# Altium PCB Dimmer_Board.PcbDoc
Units mm, origin at the board's own origin, x right, y up, seen from the top; angles counter-clockwise.
Board outline 61 x 37 mm, 2 copper layers (Top Layer, Bottom Layer), stack 1.57 mm thick; 11 components, 10 nets, 30 pads, 74 vias.
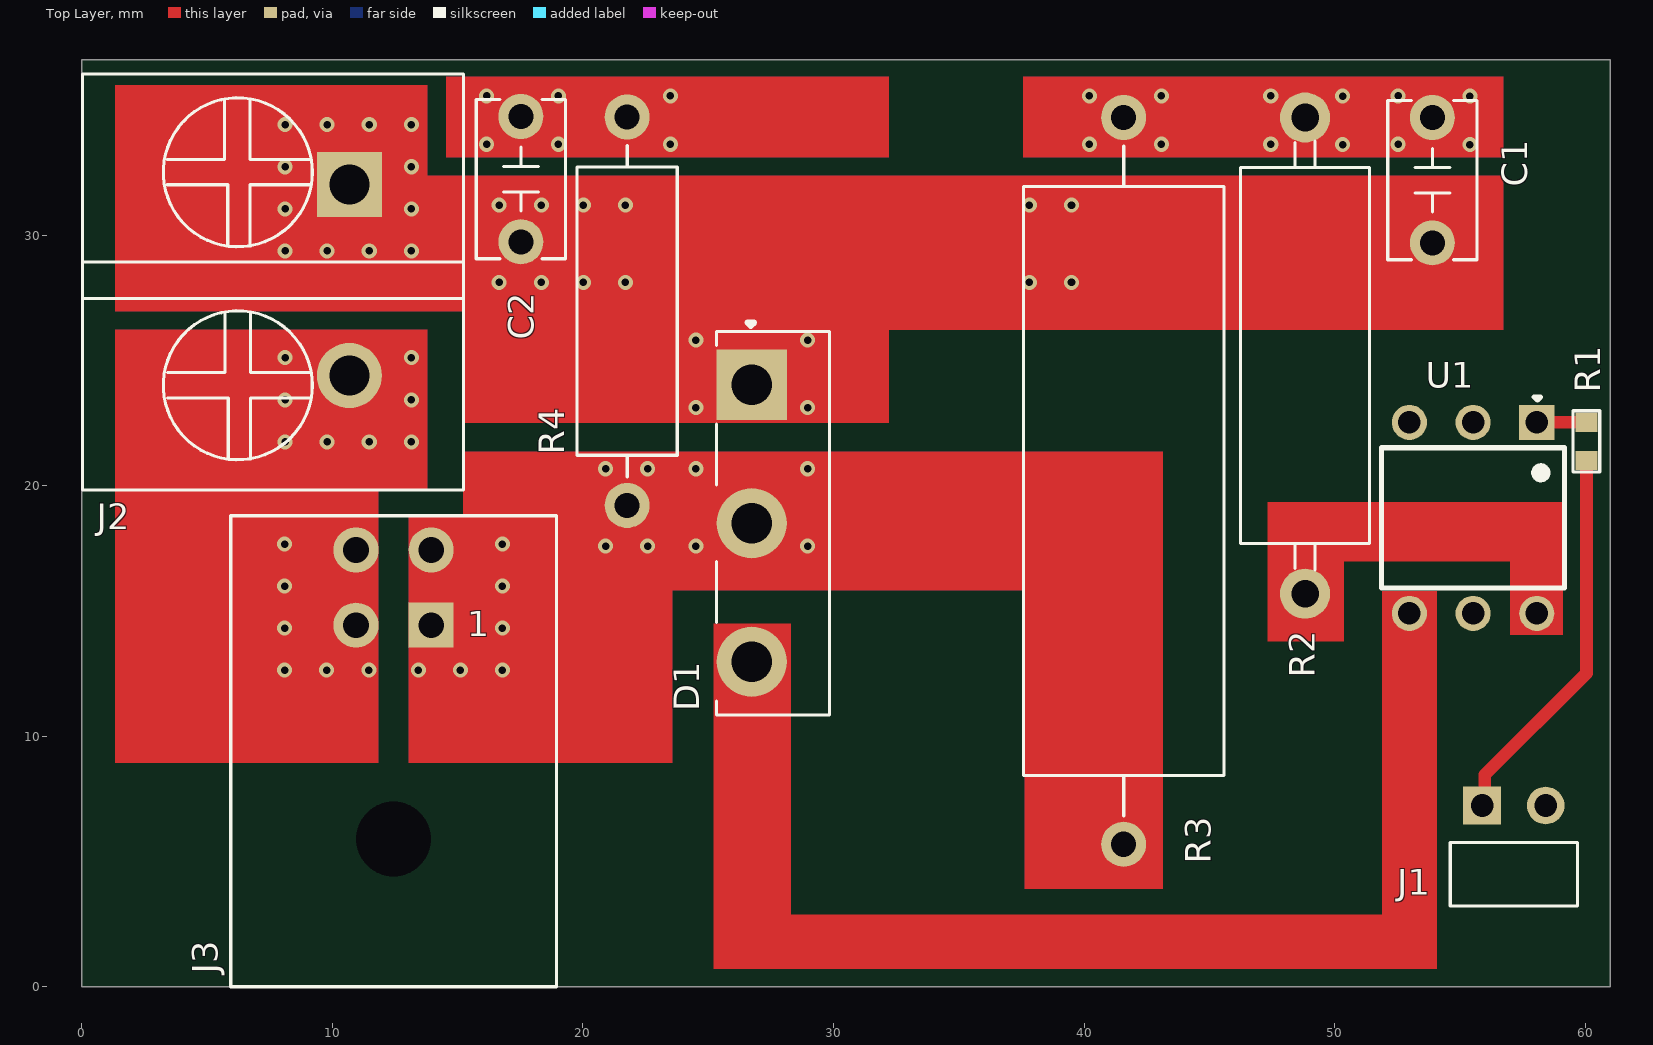
[diagram p0: Top Layer view]
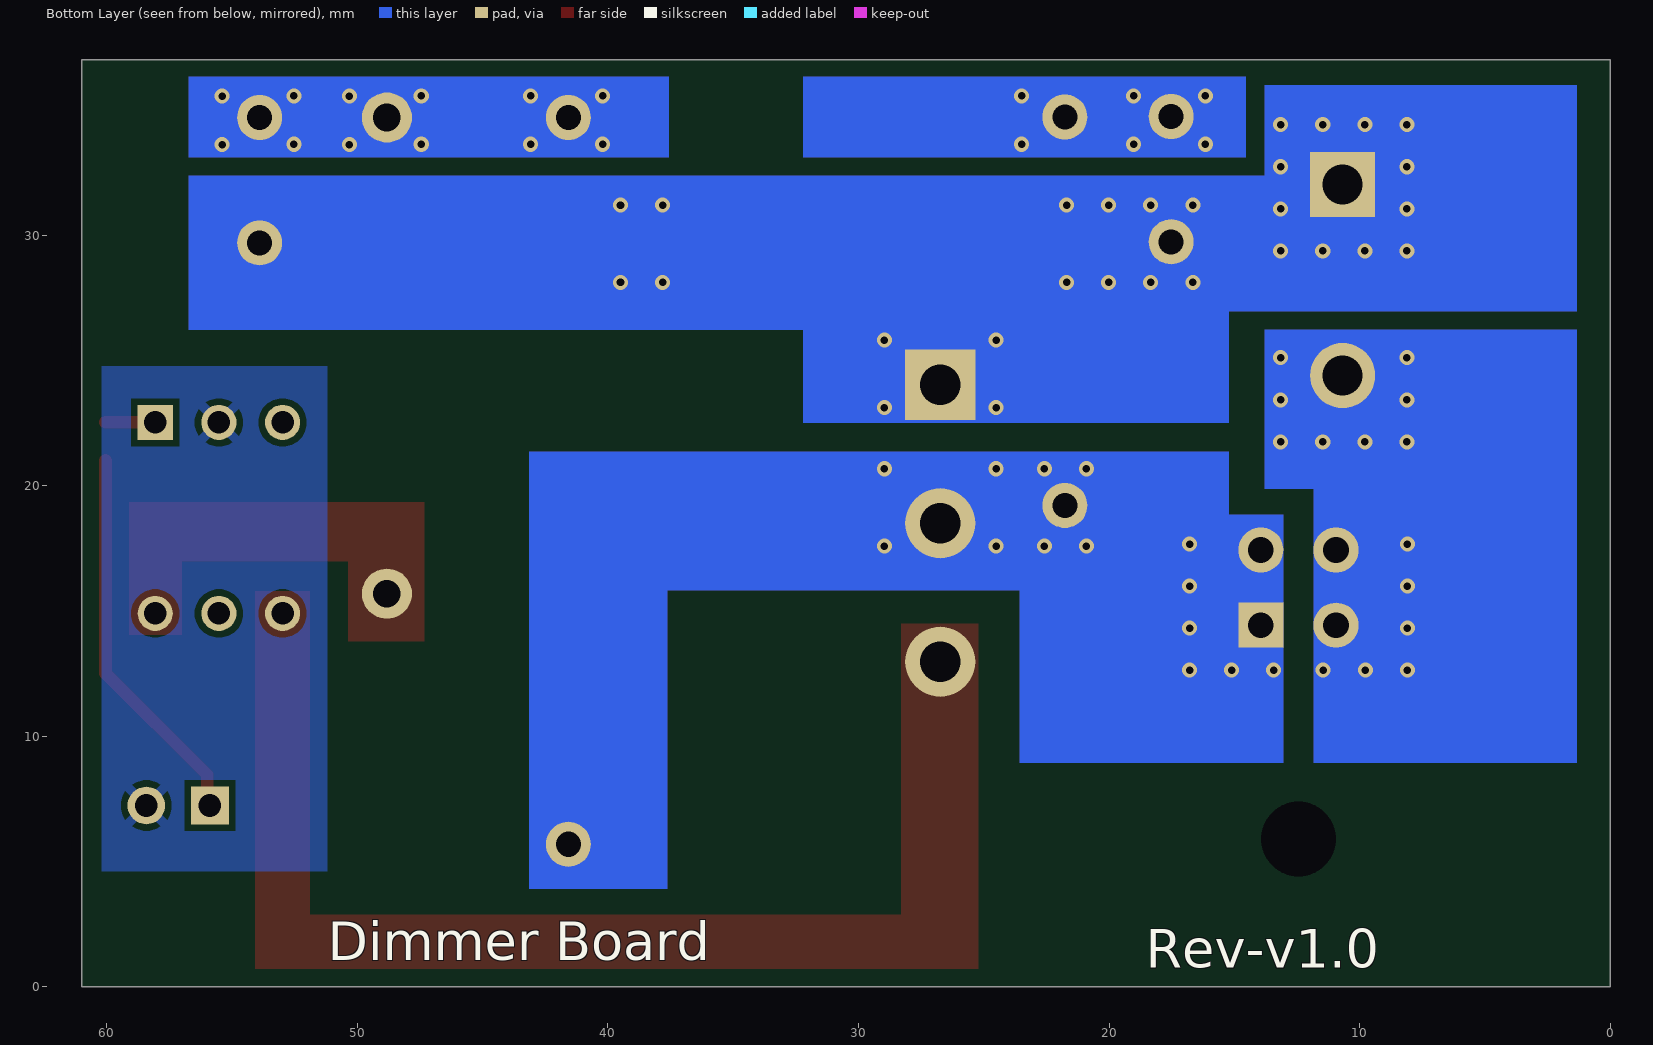
[diagram p1: Bottom Layer view, seen from below]
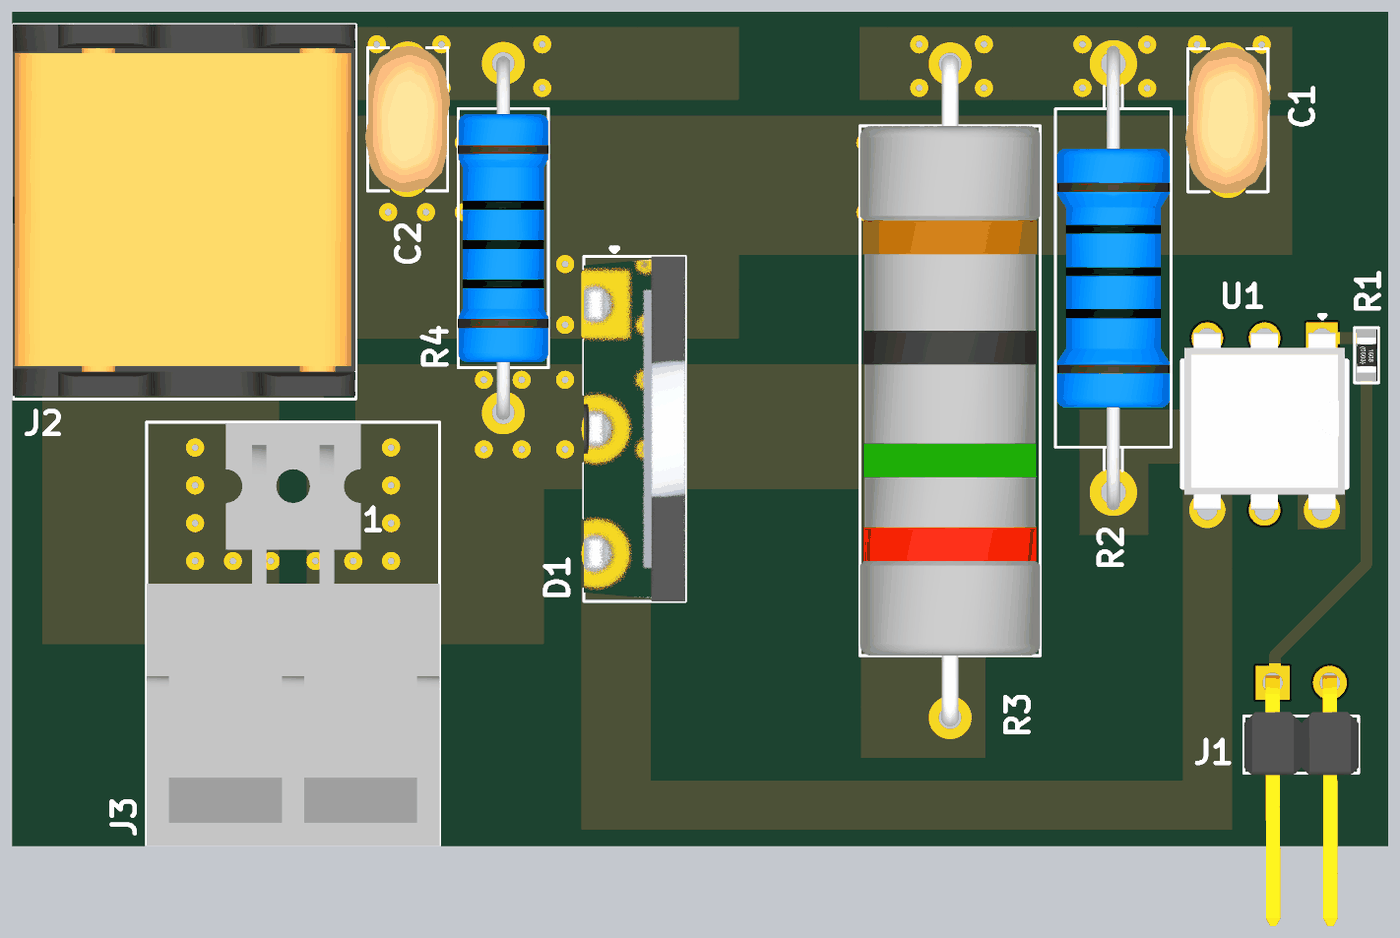
[diagram p2: 3D render of the assembled board from above, using the file's embedded part models]

## Layer stack, top to bottom
Top Solder: solder mask 0.01, Solder Resist, Dk 3.5
Top Layer: signal copper 0.035
Dielectric 1: dielectric 1.5, FR-4, Dk 4.8
Bottom Layer: signal copper 0.035
Bottom Solder: solder mask 0.01, Solder Resist, Dk 3.5

## Board outline
0,0 61,0 61,37 0,37

## Design rules (kind name [scope] priority, off if disabled: settings)
Clearance [All] p1: gap=0.254 ignorepadtopadclearanceinfootprint=FALSE
ComponentClearance [All] p1: gap=0 collisioncheckmode=3 verticalgap=0 showdistances=FALSE
HoleSize [All] p1: absolutevalues=TRUE maxlimit=3 minlimit=0.025 maxpercent=80.000 minpercent=20.000
MinimumSolderMaskSliver [All] p1: minsoldermaskwidth=0
PolygonConnect [All] p1: thpad.connectstyle=Relief thpad.reliefconductorwidth=0.381 thpad.reliefentries=4 thpad.polygonreliefangle="45 Angle" thpad.airgapwidth=0.254 smdpad.connectstyle=Direct smdpad.reliefconductorwidth=0.254 smdpad.reliefentries=4 smdpad.polygonreliefangle="90 Angle" smdpad.airgapwidth=0.254 via.connectstyle=Direct via.reliefconductorwidth=0.254 via.reliefentries=4 via.polygonreliefangle="90 Angle" via.airgapwidth=0.254
RoutingVias [All] p1: holewidth=0.3 width=0.6 viastyle="Through Hole" minholewidth=0.3 minwidth=0.6 maxholewidth=0.3 maxwidth=0.6
SilkToSilkClearance [All] p1: silktosilkclearance=0.127
SilkToSolderMaskClearance [IsPad] p1: minsilkscreentomaskgap=0 clearancetoexposedcopper=TRUE
SolderMaskExpansion [All] p1: expansion=0.102 istentingtop=FALSE
SupplyNets "Schematic Supply Nets_3" [InNet('NEUTRAL')] p1: voltage=0.000
SupplyNets "Schematic Supply Nets_2" [InNet('GND')] p2: voltage=0.000
SupplyNets "Schematic Supply Nets_1" [InNet('LOAD')] p3: voltage=0.000
SupplyNets "Schematic Supply Nets" [InNet('LIVE')] p4: voltage=0.000
UnRoutedNet [All] p1: checkbadconnections=TRUE
Width [All] p1: maxlimit=0.762 minlimit=0.254 preferedwidth=0.254 minimp=50.000000 maximp=50.000000 favimp=50.000000
24 further rules are at their usual default settings.

## Components (designator, comment, footprint, x,y, rotation, side; value= is the part's Value field where it differs from the comment)
C1 "10nF" KP103J2G0501 53.899,32.191 r270 top
C2 "10nF" KP103J2G0501 17.526,32.233 r90 top
D1 "BTA41-600BRG" TOP3 26.738,18.5 r270 top
J1 "PZ254R-11-02P" "HDR1X2 (R/A Male)" 55.88,7.239 r0 top
J2 "DBT50G-7.62-2P-BK-P" DBT50G-7.62-2P-BK-P 10.681,28.205 r270 top
J3 "0444280401" 0444280401- 12.446,14.434 r0 top
R1 "270R" Res-0603 60.046,21.768 r90 top
R2 "1K" MFR3WSJT-73-1K 48.819,25.191 r90 top value=1kR
R3 "560R" EWWR0006J500RT9 41.58,20.191 r270 top
R4 "39R" MFR2WSJT-73-39R 21.768,26.961 r270 top
U1 "MOC3023M" "6 Pin Dip" 55.524,18.714 r270 top

## Footprints (in the part's own frame and the unit in brackets; to place one, negate y for a bottom-side part, rotate by r counter-clockwise, add the part's x,y. Pads: shape width x height; smd on the part's side, far side on the other; paste and mask are expansions set on the pad)
"6 Pin Dip" [mm]
  rect 1.4x1.4 hole 0.9: 1(-3.81,2.54)
  round 1.4 hole 0.9: 2(-3.81,0) 3(-3.81,-2.54) 4(3.81,-2.54) 5(3.81,0) 6(3.81,2.54)
  silkscreen extent -4.83,-3.65 2.8,3.65, body extent -4.06,-3.56 3.81,3.56, height 4.8
0444280401- [mm]
  rect 1.8x1.8 hole 1.02: 1(1.5,0)
  round 1.8 hole 1.02: 2(-1.5,0) 3(1.5,3) 4(-1.5,3)
  round 0 hole 3 unplated: MP1(0,-8.53)
  silkscreen extent -6.5,-14.43 6.5,4.37, body extent -6.5,-14.4 6.5,4.31, height 11.95
DBT50G-7.62-2P-BK-P [mm]
  rect 2.6x2.6 hole 1.6: 1(-3.81,0)
  round 2.6 hole 1.6: 2(3.81,0)
  silkscreen extent -8.22,-10.65 8.38,4.55, body extent -8.25,-10.67 8.25,4.53, height 16.3
EWWR0006J500RT9 [mm]
  round 1.8 hole 1 paste-2539.97 mask+0.051: 1(-14.5,0) 2(14.5,0)
  silkscreen extent -13.37,-4 13.37,4, body extent -14.87,-3.99 14.87,3.99, height 8
"HDR1X2 (R/A Male)" [mm] "CONN HEADER VERT 2POS 2.54MM"
  rect 1.5x1.5 hole 0.9: 1(0,0)
  round 1.5 hole 0.9: 2(2.54,0)
  silkscreen extent -1.27,-4.01 3.81,-1.47, body extent -1.27,-10.8 3.82,0.32, height 3.09
KP103J2G0501 [mm]
  round 1.8 hole 1 paste-2539.97 mask+0.05: 1(-2.5,0) 2(2.5,0)
  silkscreen extent -3.18,-1.78 3.17,1.78, body extent -3.25,-1.88 3.25,1.88, height 9.75
MFR2WSJT-73-39R [mm]
  round 1.8 hole 1 paste-2539.97 mask+0.051: 1(-7.75,0) 2(7.75,0)
  silkscreen extent -6.61,-2 6.6,2, body extent -8.05,-2 8.05,2, height 4.01
MFR3WSJT-73-1K [mm]
  round 2 hole 1.1 paste-2539.97 mask+0.051: 1(-9.5,0) 2(9.5,0)
  silkscreen extent -8.55,-2.57 8.55,2.57, body extent -10.3,-2.51 10.3,2.51, height 5.01
Res-0603 [mil]
  rect 30x35 smd: 1(-30,0) 2(30,0)
  silkscreen extent -48,-21 48,21, body extent -31,-17 31,17, height 18
TOP3 [mm]
  rect 2.8x2.8 hole 1.63: 1(-5.525,0)
  round 2.8 hole 1.63: 2(0,0) 3(5.525,0)
  silkscreen extent -8.01,-1.4 7.65,3.1, body extent -7.65,-1.4 7.65,3.1, height 21.1

## Part data
C1 C2: library part KP103J2G0501, "10nF -40℃~+100℃ ±5% 400V Plugin,P=5mm Polypropylene Film Capacitors (CBB) ROHS", LCSC Part Number=C3019055, Manufacturer=KYET, Package=Plugin,P=5mm, ComponentLink1Description=LCSC, ComponentLink1URL=https://www.lcsc.com/product-detail/Polypropylene-Film-Capacitors-CBB_KYET-KP103J2G0501_C3019055.html, Item Type=Capacitor, Manufacturer Part Number=KP103J2G0501
D1: "80mA 50mA 600V TOP-3 Thyristors (SCR)/Modules ROHS", LCSC Part Number=C9103, Manufacturer=STMicroelectronics, Package=TOP-3, ComponentLink1Description="LCSC Link", ComponentLink1URL=https://www.lcsc.com/product-detail/Thyristors-SCR-Modules_STMicroelectronics-BTA41-600BRG_C9103.html, Item Type=Thyristors, Manufacturer Part Number=BTA41-600BRG
J1: "Right-Angle Square Pins 2.5mm 2P 6mm -40℃~+105℃ 2.54mm Plugin Black Brass 1x2P Push-Pull,P=2.54mm Pin Headers ROHS", LCSC Part Number=C492410, Manufacturer=XFCN, Package=Push-Pull,P=2.54mm, ComponentLink1Description=LCSC, ComponentLink1URL=https://www.lcsc.com/product-detail/Pin-Headers_XFCN-PZ254R-11-02P_C492410.html, Item Type="R/A Male Header", Manufacturer Part Number=PZ254R-11-02P
J2: "1x2P Corner With Cover Plate 2 1 7.62mm -40℃~+105℃ 20A 300V Black 12~22 Straight Needle Plugin,P=7.62mm Barrier Terminal Blocks ROHS", LCSC Part Number=C496127, Manufacturer=DORABO, Package=Plugin,P=7.62mm, ComponentLink1Description=LCSC, ComponentLink1URL=https://www.lcsc.com/product-detail/Barrier-Terminal-Blocks_DORABO-DBT50G-7-62-2P-BK-P_C496127.html, Item Type="Terminal Block", Manufacturer Part Number=DBT50G-7.62-2P-BK-P
J3: "CONN HEADER R/A 4POS 3MM", LCSC Part Number=C17645517, Manufacturer=Molex, Supplier Part Number=23-0444280401-ND, ComponentLink1Description=https://datasheet.ciiva.com/3119/0444280401-pcb-headers-3119509.pdf?src-supplier=Avnet, ComponentLink1URL=https://datasheet.ciiva.com/3119/0444280401-pcb-headers-3119509.pdf?src-supplier=Avnet, ComponentLink2Description=LCSC, ComponentLink2URL=https://www.lcsc.com/product-detail/Wire-To-Board-Connector_MOLEX-0444280401_C17645517.html, Item Type=Connector, Manufacturer Part Number=0444280401, Pricing="1=1.73, 10=1.47, 80=1.21413, 945=1.12499 (USD)", RoHS=Yes, Stock=7960, Supplier=Digikey
R1: library part RT0603BRE07270RL, "RES SMD 270 OHM 0.1% 1/10W 0603", Case/Package=0603, LCSC Part Number=C705836, Manufacturer=Yageo, Max Operating Temperature=125°C, Max Power Dissipation=100mW, Min Operating Temperature=-55°C, Package Quantity=5000, Resistor Type="Thin Film", Supplier Part Number 1=RT0603BRE07270RL-ND, Temperature Coefficient=50ppm/°C, Tolerance=0.1%, Voltage Rating (DC)=50V, Category="Chip SMD Resistors", ComponentLink1Description=https://datasheet.ciiva.com/2584/pyu-rt-1-to-0-05-rohs-l-5-2584379.pdf?src-supplier=Digi-Key, ComponentLink1URL=https://datasheet.ciiva.com/2584/pyu-rt-1-to-0-05-rohs-l-5-2584379.pdf?src-supplier=Digi-Key, Construction=Rectangular, Depth=0.8mm, Height=0.022inch, Item Type=Resistor, Lead Free="Lead Free", Length=0.063inch, Manufacturer Part Number=RT0603BRE07270RL, Military Standard=Not, Number of Terminations=2, Packaging="Tape and Reel", Pricing 1="5000=0.04770 (USD)", Resistance=270R, RoHS=Yes, RoHS Compliant=Yes, Series=RT, Supplier 1=Digi-Key, Width=0.031inch
R2: library part MFR3WSJT-73-1K, "RES 1K OHM 5% 3W AXIAL", Case/Package=Axial, LCSC Part Number=C176599, Manufacturer=Yageo, Max Operating Temperature=155°C, Max Power Dissipation=3W, Min Operating Temperature=-55°C, Tolerance=5%, ComponentLink1Description=http://www.yageo.com/NewPortal/yageodocoutput?fileName=/pdf/throughhole/Yageo_LR_MFR_2013.pdf&src-supplier=Digikey, ComponentLink1URL=http://www.yageo.com/NewPortal/yageodocoutput?fileName=/pdf/throughhole/Yageo_LR_MFR_2013.pdf&src-supplier=Digikey, Item Type=Resistor, Manufacturer Part Number=MFR3WSJT-73-1K, Number of Terminations=2, Packaging="Tape and Reel", Pricing="5000=0.04394 (USD)", RoHS=Yes, RoHS Compliant=Yes, Series=MFR, Supplier=Digikey
R3: library part EWWR0006J560RT9, "Wirewound Resistors 560Ω 6W ±250ppm/℃ ±5% Plugin,D8xL23.5mm Through Hole Resistors ROHS", LCSC Part Number=C348992, Manufacturer=RESI, Package=Plugin,D8xL23.5mm, ComponentLink1Description=LCSC, ComponentLink1URL=https://www.lcsc.com/product-detail/Through-Hole-Resistors_RESI-EWWR0006J560RT9_C348992.html, Item Type=Resistor, Manufacturer Part Number=EWWR0006J560RT9
R4: library part MFR2WSJT-73-39R, "Metal Film Resistors 39Ω 2W ±5% Plugin,D4.5xL11.5mm Through Hole Resistors ROHS", LCSC Part Number=C176578, Manufacturer=YAGEO, Package=Plugin,D4.5xL11.5mm, ComponentLink1Description=LCSC, ComponentLink1URL=https://www.lcsc.com/product-detail/Through-Hole-Resistors_YAGEO-MFR2WSJT-73-39R_C176578.html, Item Type=Resistor, Manufacturer Part Number=MFR2WSJT-73-39R
U1: "OPTOISOLATOR 4.17KV TRIAC 6DIP", LCSC Part Number=C5240, Manufacturer="ON Semiconductor / Fairchild", ComponentLink1Description=https://datasheet.ciiva.com/15118/getdatasheetpartid-110426-15118245.pdf?src-supplier=Verical, ComponentLink1URL=https://datasheet.ciiva.com/15118/getdatasheetpartid-110426-15118245.pdf?src-supplier=Verical, ComponentLink2Description=https://datasheet.ciiva.com/8074/1806097-8074079.pdf?src-supplier=Element14, ComponentLink2URL=https://datasheet.ciiva.com/8074/1806097-8074079.pdf?src-supplier=Element14, ComponentLink3Description=https://datasheet.ciiva.com/8084/moc3023m-8084955.pdf?src-supplier=Avnet, ComponentLink3URL=https://datasheet.ciiva.com/8084/moc3023m-8084955.pdf?src-supplier=Avnet, ComponentLink4Description=https://datasheet.ciiva.com/2092/moc3010m-2092979.pdf?src-supplier=Digikey, ComponentLink4URL=https://datasheet.ciiva.com/2092/moc3010m-2092979.pdf?src-supplier=Digikey, Item Type=IC, Manufacturer Part Number=MOC3023M, Pricing="1=0.215, 200=0.205, 750=0.196, 2500=0.19, 10000=0.176 (USD)", RoHS=Yes, Stock=46500, Supplier="Future Electronics"

## Via types
v1: diameter 0.6, hole 0.3, Top Layer to Bottom Layer, 74 vias

## Nets (pads, with @x,y where several pads share a name; then routed paths per layer and width w, separated by ;. In a path a pad name is that pad's centre, name@x,y a point inside that pad or via, vN(x,y) a via of type N, cw(c..) or ccw(c..) an arc to the next point about the centre after c; other vN are vias at no path point)
GND: J1.2 U1.2
LIVE: D1.2 J3.1 J3.3 R3.2 R4.2
  other v1: 13.435,12.639 15.113,12.639 16.791,12.639 16.791,14.317 16.791,15.995 20.904,17.591 22.582,17.591 24.509,17.591 28.967,17.591 16.791,17.673 20.904,20.676 22.582,20.676 24.509,20.676 28.967,20.676
LOAD: C1.2 C2.1 D1.1 J2.1
  other v1: 24.509,23.116 28.967,23.116 24.509,25.81 28.967,25.81 16.662,28.113 18.34,28.113 20.018,28.113 21.696,28.113 37.821,28.113 39.498,28.113 8.12,29.371 9.798,29.371 11.476,29.371 13.154,29.371 8.12,31.048 13.154,31.048 16.662,31.197 18.34,31.197 20.018,31.197 21.696,31.197 37.821,31.197 39.498,31.197 8.12,32.726 13.154,32.726 8.12,34.404 9.798,34.404 11.476,34.404 13.154,34.404
NetC1_1: C1.1 R2.2 R3.1
  other v1: 40.21,33.624 43.081,33.624 47.449,33.624 50.32,33.614 52.529,33.624 55.4,33.613 40.21,35.556 43.081,35.556 47.449,35.556 50.32,35.545 52.529,35.556 55.4,35.545
NetC2_2: C2.2 R4.1
  other v1: 16.157,33.624 19.027,33.624 23.493,33.624 16.157,35.556 19.027,35.556 23.493,35.556
NetD1_3: D1.3 U1.4
NetR1_2: R1.2 U1.1 | length 2
  Top Layer w0.508: U1.1 58.067,22.527 60.043,22.527 R1.2
NetR2_1: R2.1 U1.6
NEUTRAL: J2.2 J3.2 J3.4
  other v1: 8.101,12.639 9.779,12.639 11.457,12.639 8.101,14.317 8.101,15.995 8.101,17.673 8.12,21.751 9.798,21.751 11.476,21.751 13.154,21.751 8.12,23.428 13.154,23.428 8.12,25.106 13.154,25.106
TRIG: J1.1 R1.1 | length 15.5
  Top Layer w0.508: J1.1 55.985,7.344 55.985,8.453 60.046,12.514 R1.1
pads on no net: J3.MP1 U1.3 U1.5

## Polygon pours and split planes (outlines as drawn)
GND on Bottom Layer "GND_L02_P000" (solid, pour order 0): 51.206,24.765 51.206,4.623 60.198,4.623 60.198,24.765

## Other copper
Top Layer:
  rectangle net NetC1_1: 37.567,33.096 56.744,36.322
  rectangle net LOAD: 25.451,26.213 56.744,32.385
  region net NetR2_1: 50.368,19.355 47.32,19.355 47.32,13.79 50.368,13.79
  rectangle net NetR2_1: 47.32,16.967 59.106,19.355
  rectangle net NetR2_1: 56.998,14.046 59.106,19.355
  rectangle net NetD1_3: 51.893,0.711 54.077,15.799
  rectangle net NetD1_3: 25.222,0.711 54.077,2.896
  rectangle net NetD1_3: 25.222,0.711 28.296,14.503
  rectangle net LIVE: 13.046,8.941 23.571,18.847
  rectangle net LIVE: 15.215,15.824 43.155,21.361
  rectangle net LIVE: 37.617,3.912 43.155,21.361
  region net NEUTRAL: 11.835,26.238 1.321,26.238 1.321,8.941 11.835,8.941
  rectangle net NEUTRAL: 1.321,19.863 13.792,26.238
  rectangle net LOAD: 1.321,26.949 13.792,35.992
  rectangle net LOAD: 1.321,26.949 32.207,32.385
  rectangle net LOAD: 15.215,22.504 32.207,32.385
  rectangle net NetC2_2: 14.529,33.096 32.207,36.322
Bottom Layer:
  rectangle net NetC1_1: 37.567,33.096 56.744,36.322
  rectangle net LOAD: 25.451,26.213 56.744,32.385
  rectangle net LIVE: 15.215,15.824 43.155,21.361
  rectangle net LIVE: 13.046,8.941 23.571,18.847
  rectangle net LIVE: 37.617,3.912 43.155,21.361
  rectangle net NEUTRAL: 1.321,19.863 13.792,26.238
  region net NEUTRAL: 11.835,26.238 1.321,26.238 1.321,8.941 11.835,8.941
  rectangle net LOAD: 1.321,26.949 13.792,35.992
  rectangle net LOAD: 1.321,26.949 32.207,32.385
  rectangle net LOAD: 15.215,22.504 32.207,32.385
  rectangle net NetC2_2: 14.529,33.096 32.207,36.322

## Silkscreen, mask and mechanical layers (free items; w line width, h text height)
Bottom Overlay:
  text "Dimmer Board" at 51.177,1.061 h1.52
  text "Rev-v1.0" at 18.542,0.762 h1.52
Board Outline:
  the board outline again, w0.254
Fabrication:
  drawing of 191 lines, arcs and shapes, not listed
  text "Layer" at 83.528,46.101 h1.52
  text "Name" at 93.94,46.101 h1.52
  text "Material" at 117.555,46.101 h1.52
  text "Thickness" at 139.393,46.101 h1.52
  text "Constant" at 155.899,46.101 h1.52
  text "Board Layer Stack" at 170.374,46.101 h1.52
  text "Top Overlay" at 93.94,43.053 h1.52
  text "Top Solder" at 93.94,40.005 h1.52
  text "Solder Resist" at 117.555,40.005 h1.52
  text "0.39mil" at 139.393,40.005 h1.52
  text "3.5" at 155.899,40.005 h1.52
  text "1" at 83.528,36.957 h1.52
  text "Top Layer" at 93.94,36.957 h1.52
  text "1.38mil" at 139.393,36.957 h1.52
  text "Dielectric 1" at 93.94,33.909 h1.52
  text "FR-4" at 117.555,33.909 h1.52
  text "59.06mil" at 139.393,33.909 h1.52
  text "4.8" at 155.899,33.909 h1.52
  text "2" at 83.528,30.861 h1.52
  text "Bottom Layer" at 93.94,30.861 h1.52
  text "1.38mil" at 139.393,30.861 h1.52
  text "Bottom Solder" at 93.94,27.813 h1.52
  text "Solder Resist" at 117.555,27.813 h1.52
  text "0.39mil" at 139.393,27.813 h1.52
  text "3.5" at 155.899,27.813 h1.52
  text "Bottom Overlay" at 93.94,24.765 h1.52
  text "Total board thickness:" at 83.528,21.717 h1.52
  text "62.60mil" at 139.393,21.717 h1.52
Drill Drawing:
  circle w0.254: c2.759,74.164 r0.847
  lines w0.254: 1.912,58.077 1.912,58.5 2.336,58.924 1.912,59.347 1.912,59.77 2.336,59.77 2.759,59.347 3.182,59.77 3.606,59.77 3.606,59.347 3.182,58.924 3.606,58.5 3.606,58.077 3.182,58.077 2.759,58.5 2.336,58.077 1.912,58.077 ; 1.912,61.887 3.606,61.887 3.606,63.58 1.912,63.58 1.912,61.887 ; 1.912,66.12 2.336,66.12 2.759,65.697 3.182,66.12 3.606,66.12 3.182,66.544 3.606,66.967 3.182,66.967 2.759,67.39 2.336,66.967 1.912,66.967 2.336,66.544 1.912,66.12 ; 1.912,69.507 2.759,69.93 3.606,69.507 3.182,70.354 3.606,71.2 2.759,70.777 1.912,71.2 2.336,70.354 1.912,69.507 ; 1.912,78.82 3.606,78.82 2.759,77.127 1.912,78.82 ; 1.912,80.937 3.606,80.937 3.606,82.63 1.912,82.63 1.912,80.937 ; 1.912,85.17 2.336,85.17 2.336,84.747 3.182,84.747 3.182,85.17 3.606,85.17 3.606,86.017 3.182,86.017 3.182,86.44 2.336,86.44 2.336,86.017 1.912,86.017 1.912,85.17 ; 2.251,81.276 3.267,81.276 3.267,82.292 2.251,82.292 2.251,81.276
  lines w0.381: 0.394,56.934 282.61,56.934 ; 0.394,87.414 282.61,87.414 ; 14.386,53.124 14.386,91.224 ; 29.368,53.124 29.368,91.224 ; 57.808,53.124 57.808,91.224 ; 70.657,53.124 70.657,91.224 ; 89.296,53.124 89.296,91.224 ; 127.384,53.124 127.384,91.224 ; 142.366,53.124 142.366,91.224 ; 161.31,53.124 161.31,91.224 ; 192.034,53.124 192.034,91.224 ; 213.72,53.124 213.72,91.224 ; 247.594,53.124 247.594,91.224 ; 0.394,53.124 282.61,53.124 282.61,91.224 0.394,91.224 0.394,53.124
  text "Symbol" at 2.68,88.557 h1.83
  text "Count" at 15.529,88.557 h1.83
  text "Hole Size" at 30.511,88.557 h1.83
  text "Plated" at 58.951,88.557 h1.83
  text "Hole Type" at 71.8,88.557 h1.83
  text "Drill Layer Pair" at 90.439,88.557 h1.83
  text "Via/Pad" at 128.527,88.557 h1.83
  text "Pad Shape" at 143.509,88.557 h1.83
  text "Template" at 162.453,88.557 h1.83
  text "Description" at 193.177,88.557 h1.83
  text "Hole Tolerance (+)" at 214.863,88.557 h1.83
  text "Hole Tolerance (-)" at 248.737,88.557 h1.83
  text "1" at 15.529,84.747 h1.52
  text "3.000mm (118.11mil)" at 30.511,84.747 h1.52
  text "NPTH" at 58.951,84.747 h1.52
  text "Round" at 71.8,84.747 h1.52
  text "Top Layer - Bottom Layer" at 90.439,84.747 h1.52
  text "Pad" at 128.527,84.747 h1.52
  text "Rounded" at 143.509,84.747 h1.52
  text "c0hn300" at 162.453,84.747 h1.52
  text "2" at 15.529,80.937 h1.52
  text "1.100mm (43.31mil)" at 30.511,80.937 h1.52
  text "PTH" at 58.951,80.937 h1.52
  text "Round" at 71.8,80.937 h1.52
  text "Top Layer - Bottom Layer" at 90.439,80.937 h1.52
  text "Pad" at 128.527,80.937 h1.52
  text "Rounded" at 143.509,80.937 h1.52
  text "c200h110m205mx205p0" at 162.453,80.937 h1.52
  text "2" at 15.529,77.127 h1.52
  text "1.600mm (62.99mil)" at 30.511,77.127 h1.52
  text "PTH" at 58.951,77.127 h1.52
  text "Round" at 71.8,77.127 h1.52
  text "Top Layer - Bottom Layer" at 90.439,77.127 h1.52
  text "Pad" at 128.527,77.127 h1.52
  text "(Mixed)" at 143.509,77.127 h1.52
  text "(Mixed)" at 162.453,77.127 h1.52
  text "3" at 15.529,73.317 h1.52
  text "1.630mm (64.17mil)" at 30.511,73.317 h1.52
  text "PTH" at 58.951,73.317 h1.52
  text "Round" at 71.8,73.317 h1.52
  text "Top Layer - Bottom Layer" at 90.439,73.317 h1.52
  text "Pad" at 128.527,73.317 h1.52
  text "(Mixed)" at 143.509,73.317 h1.52
  text "(Mixed)" at 162.453,73.317 h1.52
  text "4" at 15.529,69.507 h1.52
  text "1.020mm (40.16mil)" at 30.511,69.507 h1.52
  text "PTH" at 58.951,69.507 h1.52
  text "Round" at 71.8,69.507 h1.52
  text "Top Layer - Bottom Layer" at 90.439,69.507 h1.52
  text "Pad" at 128.527,69.507 h1.52
  text "(Mixed)" at 143.509,69.507 h1.52
  text "(Mixed)" at 162.453,69.507 h1.52
  text "8" at 15.529,65.697 h1.52
  text "0.900mm (35.43mil)" at 30.511,65.697 h1.52
  text "PTH" at 58.951,65.697 h1.52
  text "Round" at 71.8,65.697 h1.52
  text "Top Layer - Bottom Layer" at 90.439,65.697 h1.52
  text "Pad" at 128.527,65.697 h1.52
  text "(Mixed)" at 143.509,65.697 h1.52
  text "(Mixed)" at 162.453,65.697 h1.52
  text "8" at 15.529,61.887 h1.52
  text "1.000mm (39.37mil)" at 30.511,61.887 h1.52
  text "PTH" at 58.951,61.887 h1.52
  text "Round" at 71.8,61.887 h1.52
  text "Top Layer - Bottom Layer" at 90.439,61.887 h1.52
  text "Pad" at 128.527,61.887 h1.52
  text "Rounded" at 143.509,61.887 h1.52
  text "(Mixed)" at 162.453,61.887 h1.52
  text "74" at 15.529,58.077 h1.52
  text "0.300mm (11.81mil)" at 30.511,58.077 h1.52
  text "PTH" at 58.951,58.077 h1.52
  text "Round" at 71.8,58.077 h1.52
  text "Top Layer - Bottom Layer" at 90.439,58.077 h1.52
  text "Via" at 128.527,58.077 h1.52
  text "Rounded" at 143.509,58.077 h1.52
  text "v60h30" at 162.453,58.077 h1.52
  text "102 Total" at 15.529,54.267 h1.52

## Dimensions
61,37 to 61,0 on Dimension
0,37 to 61,37 on Dimension

## Text inside footprints (layer, text, board x,y; h text height)
J3: Top Overlay "1" at 15.389,13.999 h1